# Altium PCB AT-kdPDB.PcbDoc
Units mm, origin at the board's own origin, x right, y up, seen from the top; angles counter-clockwise.
Board outline 40 x 40 mm, 2 copper layers (Top Layer, Bottom Layer); 28 components, 16 nets, 124 pads, 113 vias.
Unrouted connection lines stored in the file: 33.
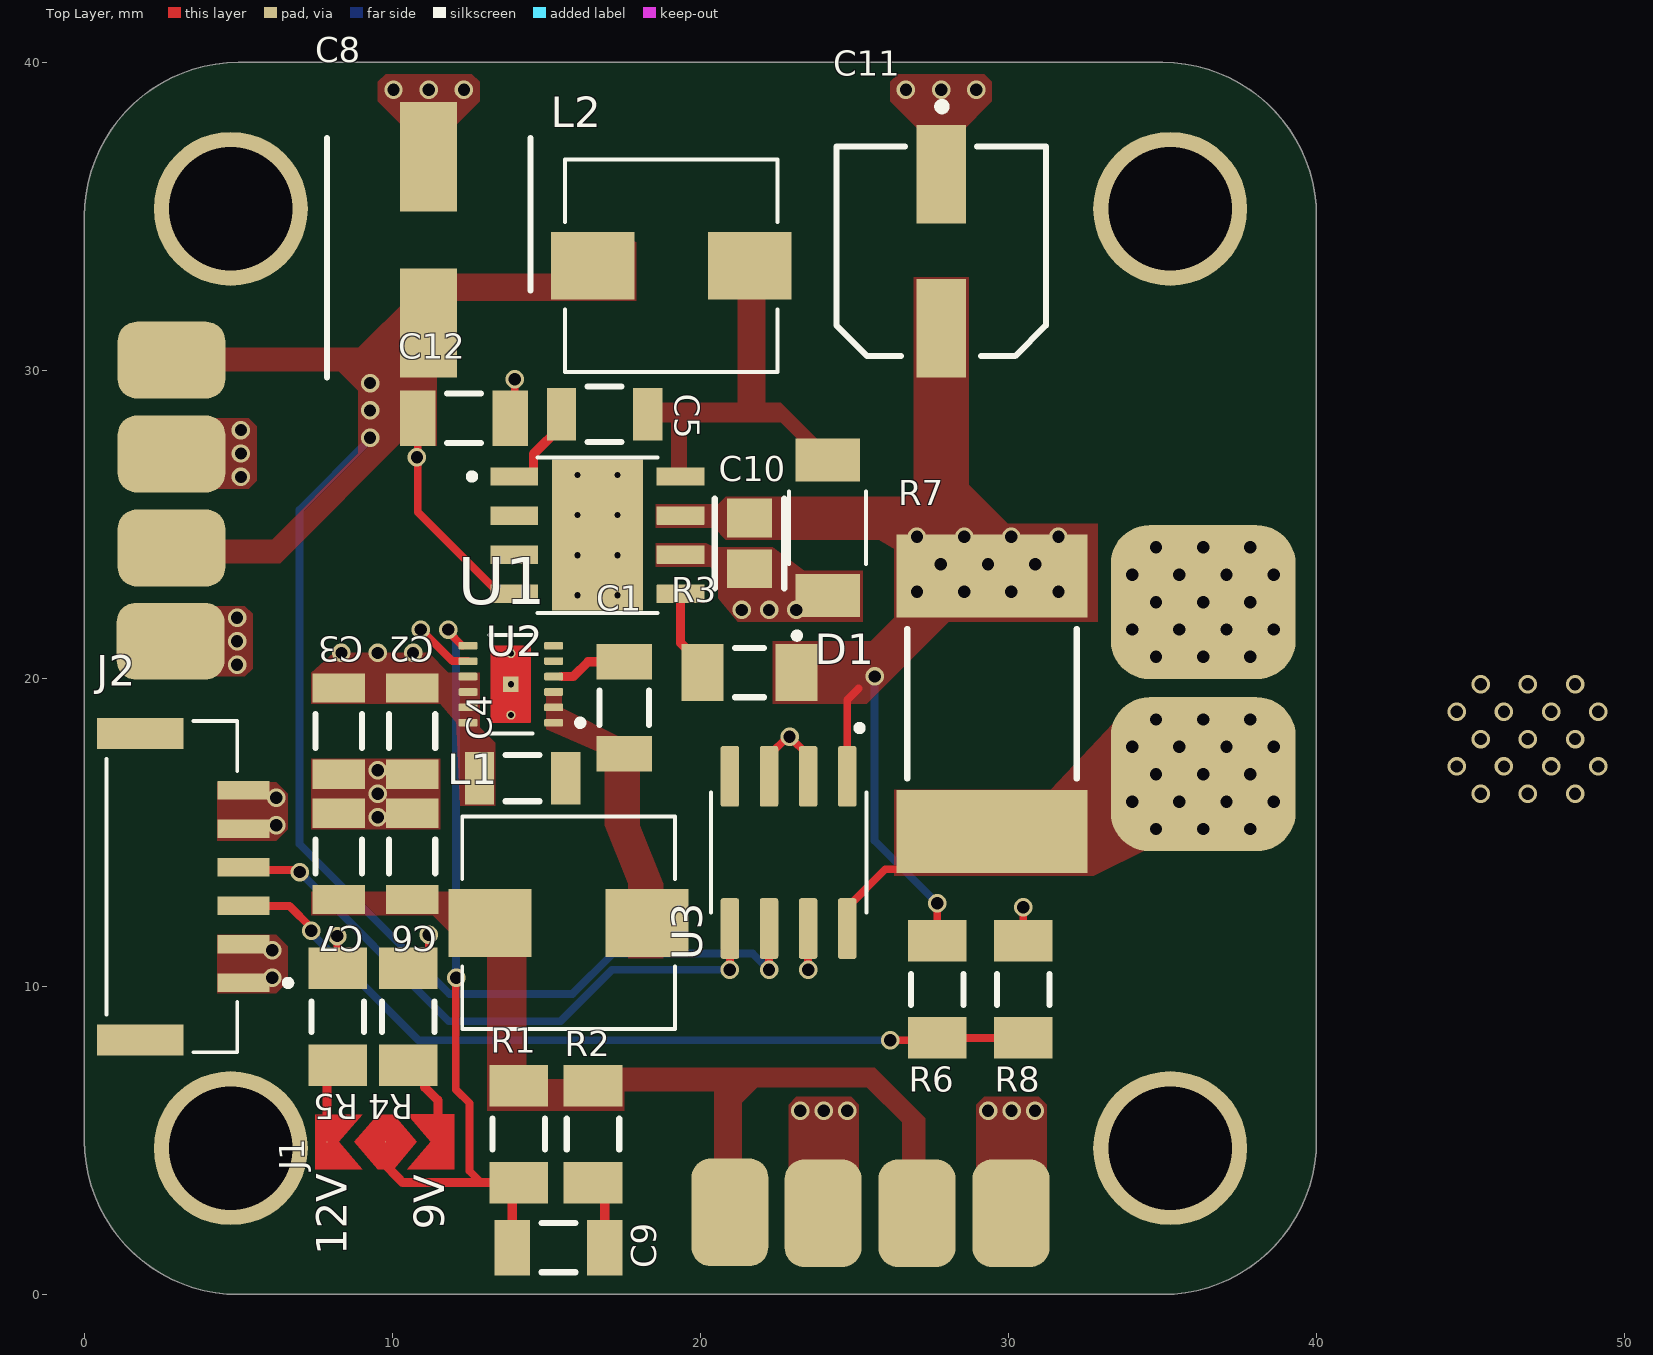
[diagram p0: Top Layer view]
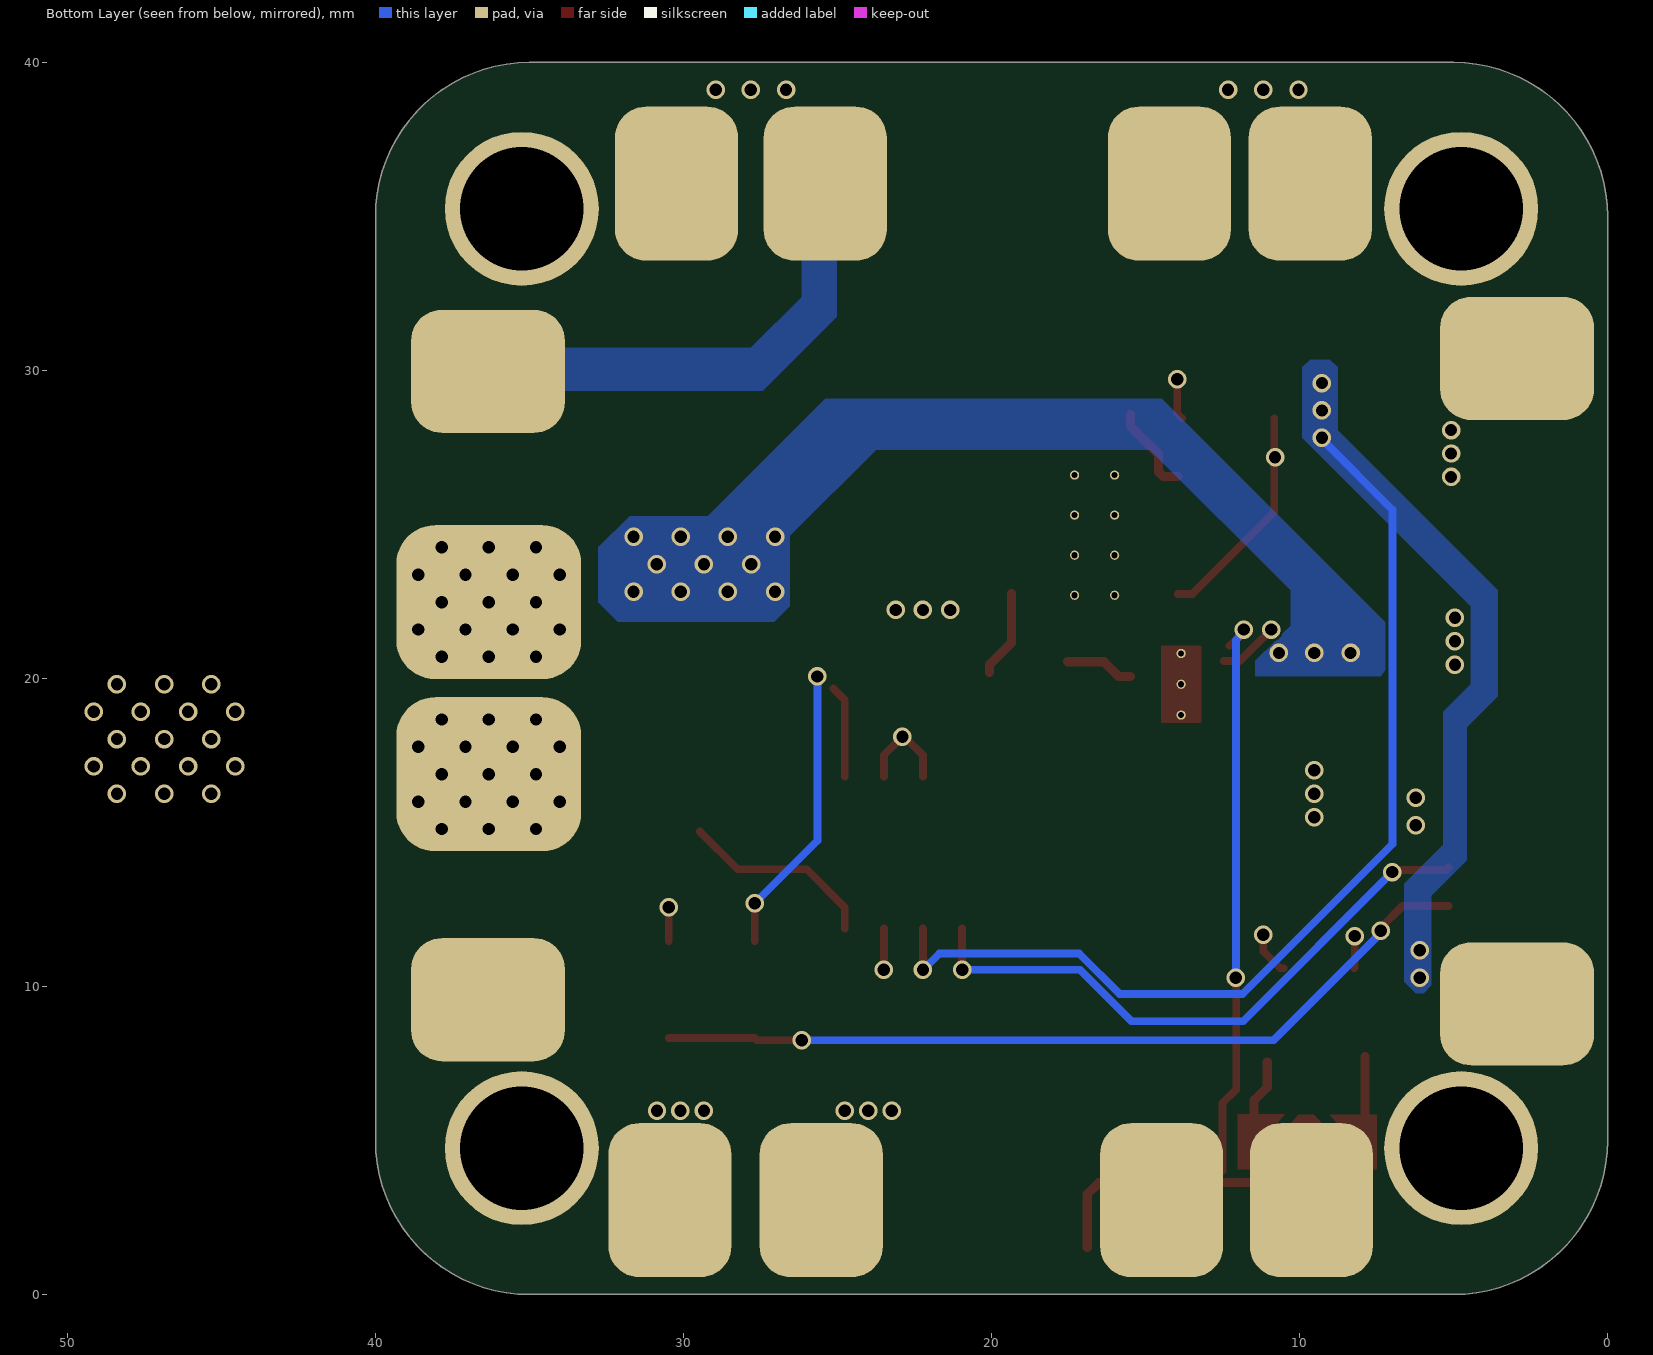
[diagram p1: Bottom Layer view, seen from below]

## Layer stack, top to bottom
Top Solder: solder mask 0.0102, Solder Resist, Dk 3.5
Top Layer: signal copper 0.0356
Dielectric 1: dielectric 0.32, FR-4, Dk 4.8
Bottom Layer: signal copper 0.0356
Bottom Solder: solder mask 0.0102, Solder Resist, Dk 3.5

## Board outline
0,5 0,35 cw(c5,35) 5,40 35,40 cw(c35,35) 40,35 40,5 cw(c35,5) 35,0 5,0 cw(c5,5)

## Design rules (kind name [scope] priority, off if disabled: settings)
Clearance [All] p1: gap=0.1 ignorepadtopadclearanceinfootprint=FALSE
PolygonConnect [All] p1: connectstyle=Direct reliefconductorwidth=0.254 reliefentries=4 polygonreliefangle="90 Angle" airgapwidth=0.254
RoutingVias [All] p1: holewidth=0.711 width=1.27 viastyle="Through Hole" minholewidth=0.3 minwidth=0.45 maxholewidth=0.711 maxwidth=1.27
SolderMaskExpansion [All] p1: expansion=0.102 istentingtop=FALSE
Width [All] p1: maxlimit=0.3 minlimit=0.1 preferedwidth=0.245 minimp=50.000000 maximp=50.000000 favimp=50.000000
30 further rules are at their usual default settings.

## Components (designator, comment, footprint, x,y, rotation, side; value= is the part's Value field where it differs from the comment)
C1 "100nF" CAPC1206(3216)170_N 17.526,19.05 r90 top value=33pF
C2 "22uF" CAPC1206(3216)190_L 10.636,18.288 r90 top
C3 "22uF" CAPC1206(3216)190_L 8.255,18.288 r90 top
C4 "33pF" CAPC1206(3216)190_L 14.224,16.764 r180 top value=22uF
C5 "10nF" FP-C1206C-EB-MFG 16.891,28.575 r180 top value="10,000 pF"
C6 "22uF" CAPC1206(3216)190_L 10.636,14.224 r270 top
C7 "22uF" CAPC1206(3216)190_L 8.255,14.224 r270 top
C8 "120UF" CAPAE660X600N 11.176,34.242 r90 top
C9 "33pF" CAPC1206(3216)170_N 15.391,1.524 r0 top
C10 "10uF" FP-GRM21B-0_2-e0_2_0_7-IPC_B 21.59,24.384 r270 top
C11 "22uF" FP-EEH-D-MFG 27.813,33.869 r270 top
C12 "100nF" CAPC1206(3216)170_N 12.319,28.448 r180 top value=33pF
D1 "sch" RBR5LAM40ATFTR 24.13,24.892 r90 top
J1 "jumperPad" jumperPad 12.562,3.189 r90 top
J2 "BM06B-GHS-TBT(LF)(SN)(N)" JST_BM06B-GHS-TBT(LF)(SN)(N) 1.811,13.241 r270 top
L1 "6.8uH" IND_CSBX0650-6R8M 15.716,12.065 r180 top
L2 "CSBL0650-100M" IND_CSBL0650-100M 19.05,33.401 r180 top
R1 "100K" RESC3216X70X40ML20T20 14.097,5.207 r90 top
R2 "1K" RESC3216X70X40ML20T20 16.51,5.207 r90 top
R3 "470K" FP-CRCW1206-e3-IPC_A 21.59,20.193 r180 top
R4 "7.15K" RESC3216X70X40ML20T20 10.509,9.017 r270 top
R5 "9.76K" RESC3216X70X40ML20T20 8.223,9.017 r270 top
R6 "70K" RESC3216X70X40ML20T20 27.686,9.906 r90 top
R7 "shunt" FP-CSS2H-3920R-1L00F-MFG 29.464,19.177 r270 top
R8 "10K" RESC3216X70X40ML20T20 30.48,9.906 r90 top
U1 "LMR51450FNDRRR" CONV_LMR51450FNDRRR 13.843,19.812 r180 top
U2 "LM22676MRX-5.0/NOPB" VREG_LM5017MR/NOPB 16.652,24.653 r0 top
U3 "INA240A1DR" SOIC127P599X175-8N 22.86,14.351 r270 top

## Footprints (in the part's own frame and the unit in brackets; to place one, negate y for a bottom-side part, rotate by r counter-clockwise, add the part's x,y. Pads: shape width x height; smd on the part's side, far side on the other; paste and mask are expansions set on the pad)
CAPAE660X600N [mm]
  rect 3.55x1.85 smd: 1(-2.7,0) 2(2.7,0)
  silkscreen extent -4.47,-3.3 3.3,3.3, body extent -3.68,-3.43 3.82,3.37, height 6.02
CAPC1206(3216)170_N [mm] "Chip Capacitor, Body 3.2x1.6mm, Height 1.7mm, IPC Medium Density"
  rect 1.15x1.8 smd: 1(-1.5,0) 2(1.5,0)
  silkscreen extent -0.55,-0.8 0.55,0.8, body extent -1.7,-0.9 1.7,0.9, height 1.7
CAPC1206(3216)190_L [mm] "Chip Capacitor, Body 3.2x1.6mm, Height 1.9mm, IPC High Density"
  rect 0.95x1.7 smd: 1(-1.4,0) 2(1.4,0)
  silkscreen extent -0.55,-0.75 0.55,0.75, body extent -1.7,-0.9 1.7,0.9, height 1.9
CONV_LMR51450FNDRRR [mm]
  rrect40% 0.62x0.25 smd mask+0: 1(-1.39,1.25) 2(-1.39,0.75) 3(-1.39,0.25) 4(-1.39,-0.25) 5(-1.39,-0.75) 6(-1.39,-1.25) 7(1.39,-1.25) 8(1.39,-0.75) 9(1.39,-0.25) 10(1.39,0.25) 11(1.39,0.75) 12(1.39,1.25)
  rect 0.5x0.5 smd paste-1 mask+0: 13(0,0)
  round 0.3 hole 0.2 mask+0: 14(0,1) 15(0,0) 16(0,-1)
  Top Layer region: 0.608,1.249 0.61,1.249 0.613,1.248 0.615,1.248 0.618,1.247 0.62,1.246 0.623,1.245 0.625,1.243 0.627,1.242 0.629,1.24 0.631,1.239 0.633,1.237 0.635,1.235 0.637,1.233 0.639,1.231 0.64,1.229 0.642,1.227 0.643,1.225 0.645,1.223 0.646,1.22 0.647,1.218 0.648,1.215 0.648,1.213 0.649,1.21 0.649,1.208 0.65,1.205 0.65,1.203 0.65,1.2 0.65,-1.2 0.65,-1.203 0.65,-1.205 0.649,-1.208 0.649,-1.21 0.648,-1.213 0.648,-1.215 0.647,-1.218 0.646,-1.22 0.645,-1.223 0.643,-1.225 0.642,-1.227 0.64,-1.229 0.639,-1.231 0.637,-1.233 0.635,-1.235 0.633,-1.237 0.631,-1.239 0.629,-1.24 0.627,-1.242 0.625,-1.243 0.623,-1.245 0.62,-1.246 0.618,-1.247 0.615,-1.248 0.613,-1.248 0.61,-1.249 0.608,-1.249 0.605,-1.25 -0.605,-1.25 -0.608,-1.249 -0.61,-1.249 -0.613,-1.248 -0.615,-1.248 -0.618,-1.247 -0.62,-1.246 -0.623,-1.245 -0.625,-1.243 -0.627,-1.242 -0.629,-1.24 -0.631,-1.239 -0.633,-1.237 -0.635,-1.235 -0.637,-1.233 -0.639,-1.231 -0.64,-1.229 -0.642,-1.227 -0.643,-1.225 -0.645,-1.223 -0.646,-1.22 -0.647,-1.218 -0.648,-1.215 -0.648,-1.213 -0.649,-1.21 -0.649,-1.208 -0.65,-1.205 -0.65,-1.203 -0.65,-1.2 -0.65,1.2 -0.65,1.203 -0.65,1.205 -0.649,1.208 -0.649,1.21 -0.648,1.213 -0.648,1.215 -0.647,1.218 -0.646,1.22 -0.645,1.223 -0.643,1.225 -0.642,1.227 -0.64,1.229 -0.639,1.231 -0.637,1.233 -0.635,1.235 -0.633,1.237 -0.631,1.239 -0.629,1.24 -0.627,1.242 -0.625,1.243 -0.623,1.245 -0.62,1.246 -0.618,1.247 -0.615,1.248 -0.613,1.248 -0.61,1.249 -0.608,1.249 -0.605,1.25 0.605,1.25
  silkscreen extent -2.35,-1.6 0.7,1.6
FP-C1206C-EB-MFG [mm]
  rect 0.95x1.7 smd paste+0 mask+0: 1(-1.4,0) 2(1.4,0)
  silkscreen extent -0.55,-0.9 0.55,0.9, body extent -2,-1 2,1, height 0.25
FP-CRCW1206-e3-IPC_A [mm]
  rect 1.356x1.858 smd paste+0 mask+0: 1(-1.526,0) 2(1.526,0)
  silkscreen extent -0.47,-0.8 0.47,0.8, body extent -2.7,-1.43 2.7,1.43, height 0.25
FP-CSS2H-3920R-1L00F-MFG [mm]
  rect 2.7x6.2 smd paste+0 mask+0: 1(-4.15,0) 2(4.15,0)
  silkscreen extent -2.42,-2.75 2.42,2.75, body extent -5.6,-3.2 5.6,3.2, height 0.25
FP-EEH-D-MFG [mm]
  rect 3.2x1.6 smd paste+0 mask+0: 1(-2.5,0) 2(2.5,0)
  silkscreen extent -4.82,-3.4 3.4,3.4, body extent -4.35,-3.65 4.35,3.65, height 0.25
FP-GRM21B-0_2-e0_2_0_7-IPC_B [mm]
  rect 1.255x1.456 smd paste+0 mask+0: 1(-0.826,0) 2(0.826,0)
  silkscreen extent -1.45,-1.13 1.45,1.13, body extent -1.7,-0.98 1.7,0.98, height 0.25
IND_CSBL0650-100M [mm]
  rect 2.7x2.2 smd: 1(-2.55,0) 2(2.55,0)
  silkscreen extent -3.45,-3.45 3.45,3.45, body extent -3.5,-3.45 3.5,3.45, height 5
IND_CSBX0650-6R8M [mm]
  rect 2.7x2.2 smd: 1(-2.55,0) 2(2.55,0)
  silkscreen extent -3.45,-3.45 3.45,3.45, body extent -3.5,-3.45 3.5,3.45, height 5
JST_BM06B-GHS-TBT(LF)(SN)(N) [mm]
  rect 0.6x1.7 smd: 1(3.125,3.35) 2(1.875,3.35) 3(0.625,3.35) 4(-0.625,3.35) 5(-1.875,3.35) 6(-3.125,3.35)
  rect 1x2.8 smd: S1(-4.975,0) S2(4.975,0)
  silkscreen extent -5.38,-1.1 5.38,4.9, body extent -5.37,-1.1 5.38,3.75, height 4.07
jumperPad [mil]
  round 1 smd: 1(70.27,42.82) 2(69.46,109.56) 3(69.46,184.56)
  Top Layer region: 104.46,99.56 69.46,69.56 34.46,99.56 34.46,119.56 69.46,149.56 104.46,119.56
  Top Layer region: 104.79,81.99 69.79,51.99 34.79,81.99 34.79,21.99 104.79,21.99
  Top Layer region: 34.46,139.56 69.46,169.56 104.46,139.56 104.46,199.56 34.46,199.56
RBR5LAM40ATFTR [mm]
  rect 1.4x2.1 smd paste-0.1: 1(-2.2,0) 2(2.2,0)
  silkscreen extent -3.6,-1.25 1.18,1.25, body extent -2.4,-1.25 2.3,1.25, height 1.05
RESC3216X70X40ML20T20 [mm] "Chip Resistor, 2-Leads, Body 3.20x1.60mm, IPC Low Density"
  rect 1.35x1.9 smd: 1(-1.575,0) 2(1.575,0)
  silkscreen extent -0.5,-0.85 0.5,0.85, body extent -1.7,-0.9 1.7,0.9, height 0.7
SOIC127P599X175-8N [mm]
  rrect25% 1.97x0.6 smd paste+0 mask+0.102: 1(-2.47,1.905) 2(-2.47,0.635) 3(-2.47,-0.635) 4(-2.47,-1.905) 5(2.47,-1.905) 6(2.47,-0.635) 7(2.47,0.635) 8(2.47,1.905)
  silkscreen extent -4.14,-2.52 1.95,2.52, body extent -3,-2.45 3,2.45, height 1.75
VREG_LM5017MR/NOPB [mm]
  rrect5% 1.55x0.6 smd mask+0: 1(-2.7,1.905) 2(-2.7,0.635) 3(-2.7,-0.635) 4(-2.7,-1.905) 5(2.7,-1.905) 6(2.7,-0.635) 7(2.7,0.635) 8(2.7,1.905)
  rect 2.95x4.9 smd paste-3 mask+0: 9(0,0)
  round 0.3 hole 0.2: 10(-0.65,1.95) 11(0.65,1.95) 12(-0.65,0.65) 13(0.65,0.65) 14(-0.65,-0.65) 16(-0.65,-1.95) 17(0.65,-1.95) ""(0.65,-0.65)
  silkscreen extent -4.17,-2.52 1.95,2.52, body extent -3,-2.45 3,2.45, height 1.7

## Part data
C1 C9 C12: library part CMP-1037-01161-1, "CAP 33pF 500V ±2% 1206 (3216 Metric) Thickness 1.7mm SMD", Case-EIA=1206, Case-Metric=3216, Rated Voltage="500 V", Tolerance=Â±2%, Max Thickness="1.7 mm", Technology=SMT
C2 C3 C4 C6 C7: library part CMP-1037-04991-1, "CAP 22uF 10V -20% to +80% 1206 (3216 Metric) Thickness 1.9mm SMD", Case-EIA=1206, Case-Metric=3216, Rated Voltage="10 V", Tolerance="-20% to +80%", Max Thickness="1.9 mm", Technology=SMT
C5: library part CMP-03020-017471-2, "C1206 10,000 pF X7R 5.00% 50 V", Capacitance="10,000 pF", manufacturer=KEMET, Manufacturer Part Number=C1206C103J5RAC7210, Package=C1206C-EB, Temperature="-55°C to +150°C", Temperature Characteristic=X7R, Temperature Coefficient=15%, Temperature Range High=+150°C, Temperature Range Low=-55°C, Tolerance=0.05, Voltage Rating="50 V", Automotive=Yes, Automotive Grade="Grade 0", Category=Cap, componentlink2description=Datasheet, componentlink2url=https://content.kemet.com/datasheets/KEM_C1007_X8R_ULTRA_150C_SMD.pdf, Device Class L1="Passive Components", Device Class L2=Capacitors, Device Class L3="Ceramic Capacitors", Height=0.88mm, Lead Free=Yes, Material=Ceramic, Octopart=https://octopart.com/c1206c103j5rac7210-kemet-3788898, RoHS=TRUE, Ipc Land Pattern Name=CAPC320160X78
C8: library part A768EB127M1DLAS034, "A768, Aluminum, Polymer Aluminum, 120 uF, 20%, 20 VDC, -55/+125C, 125C, -55C, 125C, 2,000 Hrs, 34 mOhms, 480 uA, 6.3mm, 5.7mm, 1000", Manufacturer_Name="Yageo Group", Datasheet Link=https://search.kemet.com/component-documentation/download/specsheet/A768EB127M1DLAS034, Geometry.Height=6mm, Manufacturer_Part_Number=A768EB127M1DLAS034
C10: library part CMP-06035-021046-1, "Chip Multilayer Ceramic Capacitors for General Purpose, 0805, 10uF, X6S, 22%, 10%, 35V", Case Code (Metric)=2012, Case Code (Imperial)=0805, Dielectric=X6S, Max Operating Temperature=105°C, Min Operating Temperature=-55°C, Package Quantity=3000, Tolerance=10%, Voltage Rating=35V, Capacitance=10uF, Case/Package=0805, Height=1.25mm, Lead Free="Lead Free", Length=0.079inch, Mount="Surface Mount", packaging="Tape and Reel", REACH SVHC="No SVHC", Termination=SMD/SMT, Thickness=0.057inch, Voltage Rating (DC)=35V, Weight=0.000335oz, Width=1.25mm
C11: library part CMP-05428-001309-1, "Aluminum Hybrid Polymer Capacitors 22uF 20% 50V Life 10000Hours AEC-Q200 RADIAL SMT", Case/Package=Radial, ESR (Equivalent Series Resistance)=80mR, Leakage Current=100uA, Max Operating Temperature=105°C, Min Operating Temperature=-55°C, Package Quantity=1000, Ratings=AEC-Q200, Ripple Current=1.1A, Tolerance=20%, Voltage=50V, Capacitance=22uF, Construction=Cylindrical, Diameter=6.3mm, Height=5.8mm, Height - Seated (Max)=0.24inch, Lead Diameter=0.65mm, Lead Free="Lead Free", Lead Pitch=1.8mm, Length=5.8mm, Life (Hours)=5000Hour, Material=Polymer, Mount="Surface Mount", packaging="Tape and Reel", Radiation Hardening=No, REACH SVHC="No SVHC", Ripple Current (AC)=1.1A, RoHS Compliant=Yes, series=ZA, Technology=HYBRID, Termination=SMD/SMT, Voltage Rating=50V, Voltage Rating (DC)=50V
D1: library part RBR5LAM40ATFTR
J2: "Connector Header Surface Mount 6 position 0.049 (1.25mm)", Package=None, Check_prices=https://www.snapeda.com/parts/BM06B-GHS-TBT(LF)(SN)(N)/JST/view-part/?ref=eda, MF="JST Sales", MP=BM06B-GHS-TBT(LF)(SN)(N), SnapEDA_Link=https://www.snapeda.com/parts/BM06B-GHS-TBT(LF)(SN)(N)/JST/view-part/?ref=snap
L1: library part CSBX0650-6R8M, Package=None, Availability=Unavailable, MP=CSBX0650-6R8M, Price=None
L2 U1: Package=None, Availability=Unavailable, Price=None
  L2: MP=CSBL0650-100M
  U1: MP=LMR51450FNDRRR
R1 R2 R4 R5 R6 R8: library part CMP-2003-04519-1, manufacturer="KOA Speer", Part Number=RK73B2BTTD104J
R3: library part CMP-02407-010661-1, "RES Thick Film, 470kΩ, 5%, 0.25W, 200ppm/°C, 1206", Case/Package=1206, Max Operating Temperature=155°C, Max Power Dissipation=250mW, Min Operating Temperature=-55°C, Package Quantity=20000, Resistance=470kR, Temperature Coefficient=200ppm/°C, Tolerance=5%, Composition="Thick Film", Features="Automotive AEC-Q200", Height=0.024inch, Lead Free="Lead Free", Length=0.126inch, Number of Terminations=2, packaging="Tape and Reel", Width=0.063inch
R7: library part CMP-07231-006016-1, "RES 0.001 OHM 1% 8W 3920", Case Code (Metric)=1052, Case Code (Imperial)=3920, Max Operating Temperature=170°C, Max Power Dissipation=8W, Min Operating Temperature=-55°C, Resistance=1mR, Resistor Type="Metal Element", Temperature Coefficient=50ppm/°C, Tolerance=1%, Case/Package=3920, Features="Moisture Resistant", Height=0.02inch, Length=0.394inch, Number of Terminations=2, packaging="Cut Tape", Power Rating=8W, REACH SVHC="No SVHC", RoHS Compliant=Yes, Width=0.205inch
U2: "SIMPLE SWITCHERÂ® 4.5V to 42V, 3A Step-Down Regulator with Precision Enable", Package="HSOIC-8 Texas Instruments", Check_prices=https://www.snapeda.com/parts/LM22676MRX-5.0/NOPB/Texas+Instruments/view-part/?ref=eda, MF="Texas Instruments", MP=LM22676MRX-5.0/NOPB, SnapEDA_Link=https://www.snapeda.com/parts/LM22676MRX-5.0/NOPB/Texas+Instruments/view-part/?ref=snap
U3: "-4 to 80V, bidirectional, ultra-precise current sense amplifier with enhanced PWM rejection", Package="SOIC-8 Texas Instruments", Check_prices=https://www.snapeda.com/parts/INA240A1DR/Texas+Instruments/view-part/?ref=eda, MF="Texas Instruments", MP=INA240A1DR, SnapEDA_Link=https://www.snapeda.com/parts/INA240A1DR/Texas+Instruments/view-part/?ref=snap

## Free pads (board coordinates)
  round 5 hole 4: 2(4.75,4.75) 2(4.75,35.25) 2(35.25,4.75) 2(35.25,35.25)
  rrect50% 3.5x2.5 smd: 4(2.794,21.209) 4(2.825,24.238) 4(2.825,27.286) 4(2.825,30.334)
  rrect50% 5x4 smd far side: 4(2.934,9.435) 4(2.934,30.39) 4(36.348,9.572) 4(36.348,29.972)
  rrect50% 4x5 smd far side: 4(9.615,3.061) 4(9.652,36.068) 4(14.224,36.068) 4(14.478,3.061) 4(25.4,36.068) 4(25.527,3.061) 4(30.226,36.068) 4(30.443,3.061)
  rrect50% 2.5x3.5 smd: 4(20.955,2.667) 4(23.984,2.636) 4(27.032,2.636) 4(30.08,2.636)
  rrect50% 6x5 all layers, no hole: 4(36.322,16.891) 4(36.322,22.479)

## Via types
v1: diameter 0.6, hole 0.4, Top Layer to Bottom Layer, 113 vias

## Nets (pads, with @x,y where several pads share a name; then routed paths per layer and width w, separated by ;. In a path a pad name is that pad's centre, name@x,y a point inside that pad or via, vN(x,y) a via of type N, cw(c..) or ccw(c..) an arc to the next point about the centre after c; other vN are vias at no path point)
5V: C8.1 C12.2 J2.1 J2.2 L2.2 pad.4@2.825,24.238 pad.4@2.825,30.334 U2.4 U3.6 | length 40.8
  Top Layer w0.254: C12.2 10.819,25.406 13.477,22.748 U2.4 ; v1(22.225,10.541) U3.6
  Bottom Layer w0.254: v1(9.271,27.813) 9.271,27.764 6.985,25.478 6.985,14.622 11.847,9.76 15.844,9.76 17.152,11.068 21.698,11.068 v1(22.225,10.541)
  other v1: 6.096,10.287 6.096,11.176 10.795,27.178 9.271,28.702 9.271,29.591
6SIn: pad.4@36.322,16.891 R7.2 U3.8 | length 6.4
  Top Layer w0.254: U3.8 24.765,12.566 26.003,13.804 28.241,13.804 R7.2
  other v1: 34.791,15.113 36.322,15.113 37.853,15.113 34.014,16.002 35.545,16.002 37.077,16.002 38.608,16.002 34.791,16.891 36.322,16.891 37.853,16.891 44.555,17.145 34.014,17.78 35.545,17.78 37.077,17.78 38.608,17.78 34.791,18.669 36.322,18.669 37.853,18.669
12V/9V: C6.2 C7.2 L1.2 pad.4@20.955,2.667 pad.4@27.032,2.636 R1.2 R2.2
CurrentS: J2.4 U3.5 | length 19.9
  Top Layer w0.254: J2.4 5.245,13.782 6.919,13.782 v1(6.985,13.716) ; v1(20.955,10.541) U3.5
  Bottom Layer w0.254: v1(6.985,13.716) 11.83,8.871 15.456,8.871 17.126,10.541 v1(20.955,10.541)
GND: C2.1 C3.1 C4.1 C6.1 C7.1 C8.2 C10.2 C11.1 C12.1 D1.1 J2.5 J2.6 J2.S1 J2.S2 pad.2 pad.4@2.794,21.209 pad.4@2.825,27.286 pad.4@23.984,2.636 pad.4@30.08,2.636 pad.4@36.322,22.479 R4.1 R5.1 R8.2 U1.8 U1.13 U1.14 U1.15 U1.16 U2. U2.6 U2.9 U2.10 U2.11 U2.12 U2.13 U2.14 U2.16 U2.17 U3.2 U3.3 U3.7 | length 11.4
  Top Layer w0.254: v1(8.208,11.637) 8.208,10.607 R5.1 ; R4.1 10.628,10.592 11.176,11.14 v1(11.176,11.684) ; v1(10.922,21.59) 11.948,20.564 12.451,20.564 U1.8 ; C12.1 13.97,28.599 v1(13.97,29.718) ; U3.3 22.225,17.506 22.828,18.109 v1(22.892,18.109) 23.495,17.506 U3.2 ; v1(23.495,10.541) U3.7 ; R8.2 v1(30.48,12.573)
  other v1: 23.241,5.969 24.003,5.969 24.765,5.969 29.337,5.969 30.099,5.969 30.861,5.969 6.223,15.24 9.525,15.494 6.223,16.129 9.525,16.256 9.525,17.018 4.953,20.447 34.791,20.701 36.322,20.701 37.853,20.701 4.953,21.209 34.014,21.59 35.545,21.59 37.077,21.59 38.608,21.59 4.953,21.971 21.336,22.225 22.225,22.225 23.114,22.225 34.791,22.479 36.322,22.479 37.853,22.479 34.014,23.368 35.545,23.368 37.077,23.368 38.608,23.368 34.791,24.257 36.322,24.257 37.853,24.257 5.08,26.543 5.08,27.305 5.08,28.067 10.033,39.116 11.176,39.116 12.319,39.116 26.67,39.116 27.813,39.116 28.956,39.116
NetC1_1: C1.1 L1.1 U1.1 U1.2 U1.3
NetC1_2: C1.2 U1.4 | length 2.2
  Top Layer w0.3: U1.4@15.494,20.062 15.871,20.062 16.352,20.543 17.519,20.543 C1.2
NetC5_1: C5.1 D1.2 L2.1 U2.8
NetC5_2: C5.2 U2.1 | length 2.9
  Top Layer w0.3: U2.1 14.427,26.558 14.577,26.708 14.577,27.286 15.491,28.2 C5.2
NetC9_1: C9.1 J1.2 R1.1 U1.7 | length 26.6
  Top Layer w0.254: v1(11.811,21.59) 11.811,21.523 U1.7@12.27,21.064 ; v1(12.065,10.287) 12.057,10.279 12.057,6.655 12.505,6.208 12.505,4.005 12.878,3.632 ; R1.1@13.822,3.632 R1.1
  Top Layer w0.3: J1.2 9.779,4.191 10.16,3.81 10.16,3.808 10.336,3.632 12.878,3.632 R1.1@13.822,3.632 ; C9.1 13.891,3.426 R1.1
  Bottom Layer w0.254: v1(11.811,21.59) 11.811,21.496 12.065,21.242 v1(12.065,10.287)
NetC9_2: C9.2 R2.1 | length 2.3
  Top Layer w0.3: R2.1 16.891,3.251 C9.2
NetJ1_1: J1.1 R4.2 | length 2.8
  Top Layer w0.3: R4.2@11.049,7.552 11.049,6.731 11.474,6.306 J1.1
NetJ1_3: J1.3 R5.2 | length 2.8
  Top Layer w0.3: J1.3 R5.2@7.874,7.728
NetJ2_3: J2.3 R6.1 R8.1 | length 27.3
  Top Layer w0.254: J2.3 6.655,12.616 7.366,11.905 v1(7.366,11.811) ; v1(26.162,8.255) 27.61,8.255 R6.1 R8.1
  Bottom Layer w0.254: v1(7.366,11.811) 7.366,11.734 10.845,8.255 v1(26.162,8.255)
NetR3_2: R3.2 U2.5 | length 2.8
  Top Layer w0.3: U2.5 19.352,21.156 20.064,20.444 R3.2
Vin: C2.2 C3.2 C4.2 C10.1 C11.2 pad.4@2.934,9.435 pad.4@2.934,30.39 pad.4@14.224,36.068 pad.4@14.478,3.061 pad.4@25.4,36.068 pad.4@25.527,3.061 pad.4@36.348,9.572 pad.4@36.348,29.972 R3.1 R6.2 R7.1 U1.9 U1.10 U1.11 U1.12 U2.7 U3.1 | length 12.4
  Top Layer w0.254: U3.1 24.765,19.304 25.135,19.674 ; R6.2 v1(27.686,12.7)
  Bottom Layer w0.254: v1(25.654,20.066) 25.654,14.732 v1(27.686,12.7)
  other v1: 8.344,20.828 9.525,20.828 10.668,20.828 27.029,22.819 28.56,22.819 30.092,22.819 31.623,22.819 27.806,23.708 29.337,23.708 30.868,23.708 27.029,24.597 28.56,24.597 30.092,24.597 31.623,24.597
pads on no net: U1.5 U1.6 U2.2 U2.3 U3.4
copper on no net:
  other v1: 45.332,16.256 46.863,16.256 48.394,16.256 46.086,17.145 47.618,17.145 49.149,17.145 45.332,18.034 46.863,18.034 48.394,18.034 44.555,18.923 46.086,18.923 47.618,18.923 49.149,18.923 45.332,19.812 46.863,19.812 48.394,19.812

## Polygon pours and split planes (outlines as drawn)
GND on Top Layer "GND_L01_P004" (solid, pour order 4): 26.162,39.37 26.416,39.624 29.21,39.624 29.464,39.37 29.464,38.735 28.448,37.719 27.178,37.719 26.162,38.735
Vin on Top Layer "VIN_L01_P009" (solid, pour order 9): 7.366,19.177 11.557,19.177 12.192,18.415 12.827,18.415 12.827,20.193 11.811,20.193 11.176,20.828 8.096,20.828 7.366,20.193
Vin on Top Layer "VIN_L01_P000" (solid, pour order 0): 22.352,19.177 22.352,21.209 25.527,21.209 26.289,21.971 26.289,24.892 26.924,26.162 26.924,33.02 28.702,33.02 28.702,26.289 29.972,25.019 32.893,25.019 32.893,21.844 28.067,21.844 25.4,19.177
5V on Top Layer "5V_L01_P028" (solid, pour order 28): 3.81,30.734 8.89,30.734 10.541,32.385 10.541,27.94 6.35,23.749 3.683,23.749 3.683,24.511 6.096,24.511 8.89,27.305 8.89,29.337 8.255,29.972 3.81,29.972
5V on Top Layer "5V_L01_P018" (solid, pour order 18): 4.318,11.684 6.223,11.684 6.604,11.303 6.604,10.16 6.223,9.779 4.318,9.779
12V/9V on Top Layer "12V/9V_L01_P015" (solid, pour order 15): 7.366,12.319 11.303,12.319 11.811,11.811 13.081,11.811 13.081,5.969 17.526,5.969 17.526,6.985 14.351,6.985 14.351,10.922 14.351,13.081 7.366,13.081
12V/9V on Top Layer "12V/9V_L01_P027" (solid, pour order 27): 17.076,6.604 20.447,6.604 20.447,3.683 21.336,3.683 21.336,6.223 21.844,6.731 25.4,6.731 26.543,5.588 26.543,3.81 27.305,3.81 27.305,5.715 25.654,7.366 17.145,7.366
NetC1_1 on Top Layer "NETC1_1_L01_P010" (solid, pour order 10): 14.986,18.359 14.986,19.685 15.494,19.685 15.494,19.05 17.526,18.034 18.034,18.034 18.034,15.24 18.796,13.335 18.796,10.922 17.653,10.922 17.653,13.335 16.891,15.24 16.891,17.526
NetC5_1 on Top Layer "NETC5_1_L01_P029" (solid, pour order 29): 18.288,28.321 19.05,28.321 19.05,26.543 19.558,26.543 19.558,28.321 22.606,28.321 23.876,27.051 24.511,27.051 22.606,28.956 22.098,28.956 22.098,33.401 21.209,33.401 21.209,28.956 18.288,28.956
GND on Top Layer "GND_L01_P026" (solid, pour order 26): 2.286,22.352 5.207,22.352 5.461,22.098 5.461,20.32 5.207,20.066 2.286,20.066
GND on Top Layer "GND_L01_P025" (solid, pour order 25): 28.956,3.238 28.956,6.159 29.21,6.413 30.988,6.413 31.242,6.159 31.242,3.238
GND on Top Layer "GND_L01_P024" (solid, pour order 24): 22.86,3.239 22.86,6.159 23.114,6.414 24.892,6.413 25.146,6.159 25.146,3.239
GND on Top Layer "GND_L01_P023" (solid, pour order 23): 2.413,28.448 5.334,28.448 5.588,28.194 5.588,26.416 5.334,26.162 2.413,26.162
5V on Top Layer "5V_L01_P019" (solid, pour order 19): 10.414,27.559 10.414,33.147 15.762,33.147 17.907,34.283 17.907,32.258 14.605,32.258 11.43,32.258 11.43,27.559
GND on Top Layer "GND_L01_P017" (solid, pour order 17): 4.318,16.637 6.223,16.637 6.604,16.256 6.604,15.113 6.223,14.732 4.318,14.732
GND on Top Layer "GND_L01_P016" (solid, pour order 16): 7.366,17.399 11.557,17.399 11.557,15.113 7.366,15.113
Vin on Top Layer "VIN_L01_P014" (solid, pour order 14): 12.065,18.669 12.192,15.875 13.335,15.875 13.335,17.907 12.827,18.415
GND on Top Layer "GND_L01_P008" (solid, pour order 8): 18.542,23.622 18.542,24.384 20.193,24.384 20.447,24.257 22.352,24.257 23.368,23.495 25.273,23.495 25.273,21.844 21.209,21.844 20.574,22.606 20.574,23.368 20.32,23.622 19.939,23.622
Vin on Top Layer "VIN_L01_P006" (solid, pour order 6): 18.542,25.654 20.574,25.654 20.828,25.908 26.67,25.908 26.924,26.162 27.051,26.035 26.416,24.13 25.781,24.511 20.828,24.511 20.447,24.892 18.542,24.892
GND on Top Layer "GND_L01_P005" (solid, pour order 5): 9.525,39.37 9.779,39.624 12.573,39.624 12.827,39.37 12.827,38.735 11.811,37.719 10.541,37.719 9.525,38.735
6SIn on Top Layer "6SIN_L01_P001" (solid, pour order 1): 26.289,13.589 26.289,16.383 31.369,16.383 33.401,18.542 34.163,19.304 38.354,19.304 39.243,18.415 39.243,15.24 38.481,14.478 34.544,14.478 32.766,13.589
Vin on Bottom Layer "VIN_L02_P032" (solid, pour order 32): 25.019,36.195 25.019,31.75 27.432,29.337 36.576,29.337 36.576,30.734 27.813,30.734 26.162,32.385 26.162,36.195
GND on Bottom Layer "GND_L02_P013" (solid, pour order 13): 80.962,39.421 88.557,39.421 cw(c88.557,34.671) 93.307,34.671 93.307,4.877 cw(c88.43,4.877) 88.43,0 58.89,0 cw(c58.89,5.004) 53.886,5.004 53.886,34.544 cw(c58.763,34.544) 58.763,39.421
Vin on Bottom Layer "VIN_L02_P031" (solid, pour order 31): 7.366,20.066 11.43,20.066 11.43,20.574 10.287,21.717 10.287,22.86 14.859,27.432 23.749,27.432 26.543,24.638 26.543,22.352 27.051,21.844 32.131,21.844 32.766,22.479 32.766,24.257 31.75,25.273 29.21,25.273 25.4,29.083 14.478,29.083 7.112,21.717 7.112,20.447
5V on Bottom Layer "5V_L02_P030" (solid, pour order 30): 5.969,9.779 6.223,9.779 6.604,10.16 6.604,13.335 5.334,14.605 5.334,18.923 4.445,19.812 4.445,22.352 9.906,27.813 9.906,30.099 9.652,30.353 9.017,30.353 8.763,30.099 8.763,28.067 3.556,22.86 3.556,19.431 4.572,18.415 4.572,14.097 5.715,12.954 5.715,10.033

## Silkscreen, mask and mechanical layers (free items; w line width, h text height)
Top Overlay:
  text "9V" at 11.684,2.103 h1 r90
  text "12V" at 8.509,1.27 h1 r90
Mechanical 1:
  the board outline again, w0.254